# Altium PCB Urukul.PcbDoc (part 7 of 15)
Units mm, origin at the board's own origin, x right, y up, seen from the top; angles counter-clockwise.
Board outline 161.99 x 100 mm, 6 copper layers (L1, L2, L3, L4, P5, L6), stack 1.548 mm thick; 1078 components, 609 nets, 3798 pads, 2552 vias.
Unrouted connection lines stored in the file: 1.
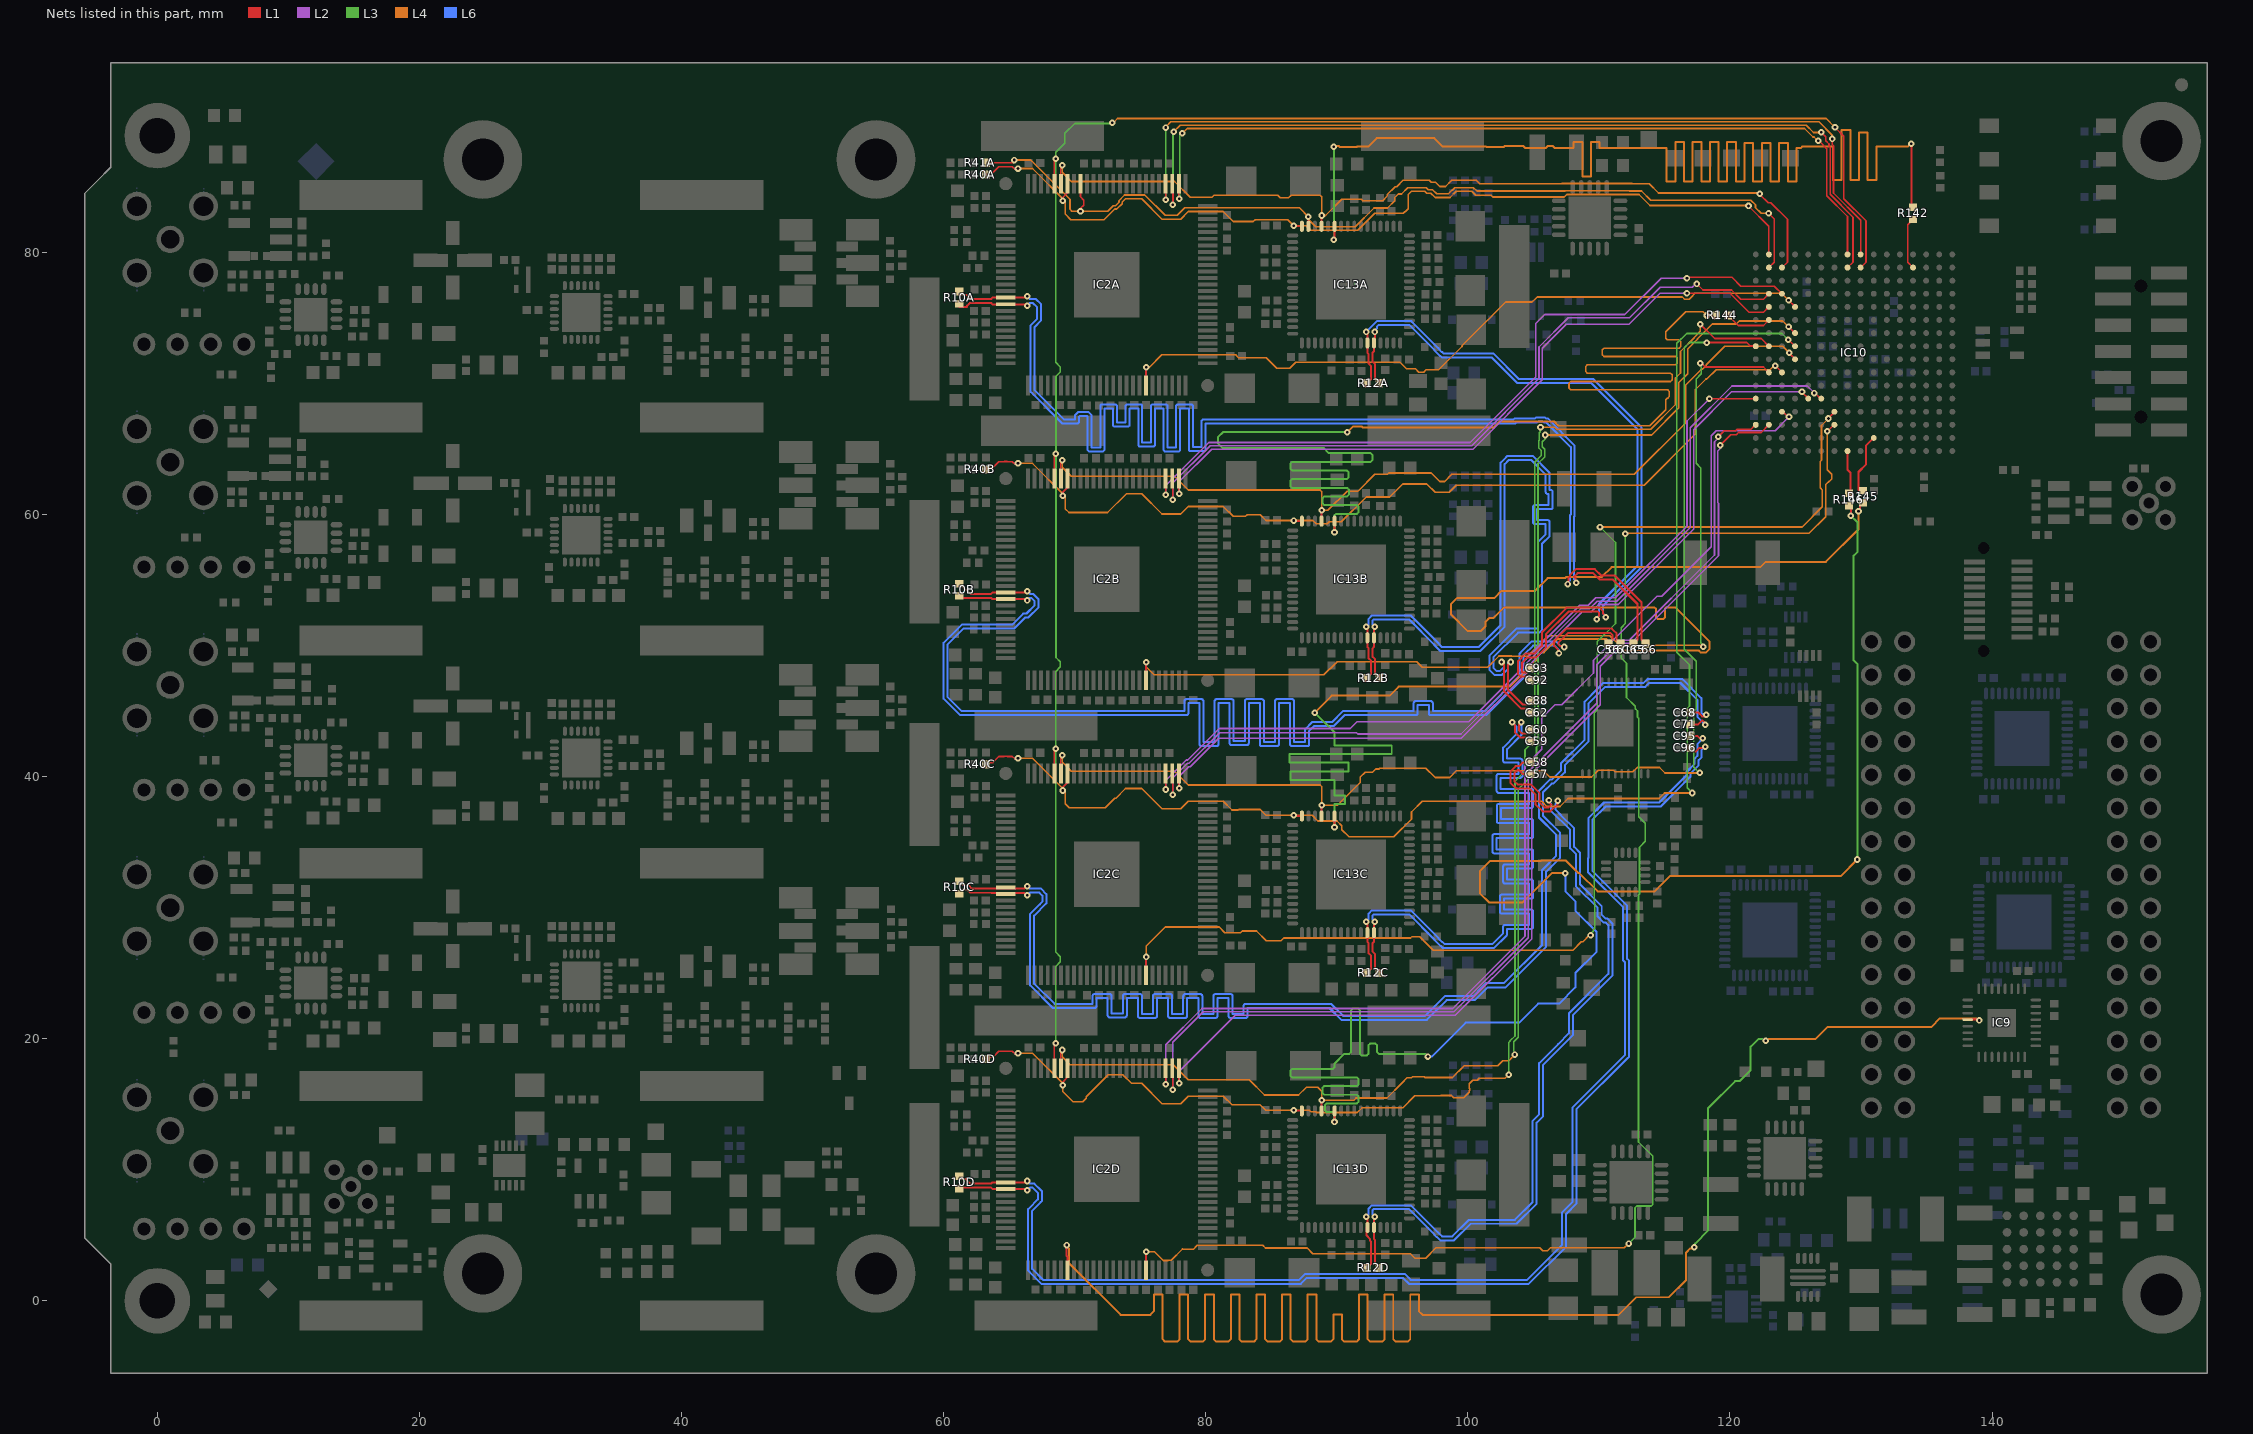
[diagram p9: the nets of this part, all layers, seen from the top]

## Via types
v1: diameter 0.5, hole 0.2, L1 to L6, tented both sides, 1964 vias
v2: diameter 0.5, hole 0.2, L1 to L6, 480 vias
v3: diameter 0.6, hole 0.3, L1 to L6, tented both sides, 52 vias
v4: diameter 0.6, hole 0.3, L1 to L6, 36 vias
v5: diameter 0.762, hole 0.508, L1 to L6, tented both sides, 20 vias

## Nets (pads, with @x,y where several pads share a name; then routed paths per layer and width w, separated by ;. In a path a pad name is that pad's centre, name@x,y a point inside that pad or via, vN(x,y) a via of type N, cw(c..) or ccw(c..) an arc to the next point about the centre after c; other vN are vias at no path point) (continued)
DDS3_SYNC_IN_P: IC2D.7 IC9.28 | length 161.9
  L1 w0.152: v1(69.381,4.256) 69.367,4.243 69.367,3.444 69.444,3.367 IC2D.7@69.444,2.341 ; IC9.28@138.141,21.455 138.958,21.455 v1(139.022,21.391)
  L3 w0.15: v1(117.276,4.075) 117.343,4.142 117.343,4.37 118.34,5.367 118.34,14.711 120.39,16.761 120.728,16.761 121.568,17.601 121.568,19.391 121.582,19.391 122.185,19.994 122.474,19.994 122.628,19.84 v1(122.723,19.84)
  L4 w0.15: v1(69.381,4.256) 69.381,4.163 69.551,3.993 69.551,2.886 73.507,-1.071 75.469,-1.071 75.77,-1.071 76.046,-0.796 76.046,0.468 76.704,0.468 76.704,-2.92 76.891,-3.107 77.814,-3.107 78.002,-2.92 78.002,0.468 78.66,0.468 78.66,-2.92 78.847,-3.107 79.77,-3.107 79.958,-2.92 79.958,0.468 80.616,0.468 80.616,-2.92 80.803,-3.107 81.726,-3.107 81.914,-2.92 81.914,0.468 82.572,0.468 82.572,-2.92 82.759,-3.107 83.682,-3.107 83.87,-2.92 83.87,0.468 84.528,0.468 84.528,-2.92 84.715,-3.107 85.638,-3.107 85.826,-2.92 85.826,0.468 86.484,0.468 86.484,-2.92 86.671,-3.107 87.594,-3.107 87.782,-2.92 87.782,0.468 88.44,0.468 88.44,-2.92 88.627,-3.107 89.55,-3.107 89.738,-2.92 89.738,-1.046 90.396,-1.046 90.396,-2.92 90.583,-3.107 91.506,-3.107 91.694,-2.92 91.694,0.468 92.352,0.468 92.352,-2.92 92.539,-3.107 93.462,-3.107 93.65,-2.92 93.65,0.468 94.308,0.468 94.308,-2.92 94.495,-3.107 95.418,-3.107 95.606,-2.92 95.606,0.468 96.264,0.468 96.264,-0.796 96.539,-1.071 97.688,-1.071 111.506,-1.071 112.847,0.27 115.333,0.27 116.645,1.581 116.645,3.672 116.981,4.008 117.209,4.008 v1(117.276,4.075) ; v1(122.723,19.84) 122.817,19.84 122.971,19.994 126.533,19.994 127.444,20.905 135.385,20.905 136.025,21.545 138.774,21.545 138.927,21.391 v1(139.022,21.391)
DDS_CLKA_N: C93.1 IC13A.28 R12A.2 | length 53.9
  L1 w0.152: v1(92.91,73.927) 92.91,73.167 IC13A.28@92.834,73.091 92.834,72.453 92.75,72.369 92.727,72.369 92.727,71.648 92.921,71.453 92.921,70.331 R12A.2@93.239,70.013 ; C93.1@104.794,48.248 104.496,47.951 104.14,47.951 104.14,48.691 104.546,49.097 105.216,49.097 105.96,49.841 105.96,50.866 107.679,52.584 109.923,52.584 110.013,52.495 110.013,52.279 109.838,52.105 v1(109.838,52.016)
  L6 w0.152: v1(92.91,73.927) 92.91,74.021 93.084,74.196 93.084,74.346 93.18,74.442 94.532,74.442 94.539,74.449 94.914,74.449 94.921,74.442 95.565,74.442 97.438,72.569 97.438,72.543 97.897,72.084 97.923,72.084 98.044,71.963 101.841,71.963 103.77,70.033 109.427,70.033 112.944,66.516 112.944,56.103 110.009,53.169 110.009,52.279 109.838,52.108 v1(109.838,52.016)
DDS_CLKA_P: C92.1 IC13A.27 R12A.1 | length 56.2
  L1 w0.152: R12A.1@92.299,70.013 92.617,70.331 92.617,71.327 92.422,71.521 92.422,72.243 92.334,72.331 IC13A.27@92.334,73.091 v1@92.334,73.851 ; C92.1@104.794,47.348 104.496,47.646 104.013,47.646 103.835,47.824 103.835,48.817 104.42,49.402 105.09,49.402 105.312,49.625 105.312,49.635 105.648,49.971 105.648,50.995 107.549,52.897 108.836,52.897 108.844,52.889 110.05,52.889 110.317,52.621 110.317,52.425 110.523,52.22 v1(110.523,52.162)
  L6 w0.152: v1(92.258,73.927) 92.258,73.951 93.054,74.747 94.405,74.747 94.412,74.754 95.04,74.754 95.047,74.747 95.691,74.747 97.743,72.695 97.743,72.669 98.023,72.389 98.049,72.389 98.171,72.268 101.967,72.268 103.897,70.338 109.553,70.338 113.249,66.643 113.249,55.977 110.657,53.385 110.657,53.375 110.322,53.04 110.322,52.425 110.523,52.224 v1(110.523,52.162)
DDS_CLKB0_N: C66.1 IC2A.91 R10A.2 | length 103.8
  L1 w0.152: R10A.2@61.194,75.818 61.78,75.818 61.801,75.839 61.801,75.932 62.007,76.138 63.62,76.138 63.718,76.041 IC2A.91@64.744,76.041 v1@66.294,76.041 ; v1(107.611,54.691) 107.677,54.758 107.677,55.139 107.788,55.25 107.788,55.376 108.246,55.834 109.693,55.834 110.181,55.346 111.198,55.346 113.249,53.294 113.249,50.433 C66.1@113.544,50.138
  L6 w0.152: v1(66.394,75.941) 66.592,76.138 66.802,76.138 67.142,75.799 67.142,74.936 66.639,74.433 66.639,69.362 69.068,66.933 70.24,66.933 70.329,67.023 70.329,67.443 70.418,67.532 70.9,67.532 70.989,67.443 70.989,64.912 71.079,64.822 72.17,64.822 72.259,64.912 72.259,68.099 72.92,68.099 72.92,66.79 73.009,66.7 74.101,66.7 74.19,66.79 74.19,68.099 74.85,68.099 74.85,65.278 74.939,65.189 76.031,65.189 76.12,65.278 76.12,68.099 76.781,68.099 76.781,64.912 76.87,64.822 77.961,64.822 78.051,64.912 78.051,68.099 78.711,68.099 78.711,64.918 78.8,64.829 79.892,64.829 79.981,64.918 79.981,66.933 103.606,66.933 103.694,67.022 105.269,67.022 105.356,67.109 105.732,67.109 105.819,67.022 105.963,67.022 107.786,65.199 107.852,65.133 107.852,60.005 107.788,59.941 107.788,54.954 107.611,54.777 v1(107.611,54.691)
DDS_CLKB0_P: C65.1 IC2A.90 R10A.1 | length 103
  L1 w0.152: R10A.1@61.194,76.758 61.78,76.758 62.095,76.443 63.62,76.443 63.718,76.541 IC2A.90@64.744,76.541 v1@66.294,76.541 ; v1(108.271,54.787) 108.204,54.854 108.204,55.139 108.093,55.25 108.373,55.53 109.566,55.53 110.055,55.041 111.072,55.041 112.945,53.168 112.945,50.439 C65.1@112.644,50.138
  L6 w0.152: v1(66.394,76.641) 66.528,76.506 66.592,76.443 67.03,76.443 67.446,76.027 67.446,74.81 66.944,74.307 66.944,69.488 69.194,67.238 70.024,67.238 70.024,67.569 70.292,67.837 71.026,67.837 71.294,67.569 71.294,65.127 71.955,65.127 71.955,68.315 72.044,68.404 73.135,68.404 73.225,68.315 73.225,67.005 73.885,67.005 73.885,68.315 73.974,68.404 75.066,68.404 75.155,68.315 75.155,65.493 75.815,65.493 75.815,68.315 75.905,68.404 76.996,68.404 77.085,68.315 77.085,65.127 77.746,65.127 77.746,68.315 77.835,68.404 78.927,68.404 79.016,68.315 79.016,65.133 79.676,65.133 79.676,67.149 79.765,67.238 103.479,67.238 103.568,67.327 105.143,67.327 105.23,67.414 105.858,67.414 105.945,67.327 106.089,67.327 108.157,65.259 108.157,59.879 108.093,59.815 108.093,55.05 108.271,54.873 v1(108.271,54.787)
DDS_CLKB1_N: C61.1 IC2B.91 R10B.2 | length 103.3
  L1 w0.152: R10B.2@61.194,53.788 61.344,53.638 63.62,53.638 63.718,53.541 IC2B.91@64.744,53.541 66.294,53.541 v1(66.394,53.441) ; v1(106.951,49.412) 106.884,49.479 106.884,49.675 106.59,49.97 106.59,50.355 107.52,51.285 110.987,51.285 111.133,51.139 111.346,50.925 111.346,50.436 C61.1@111.644,50.138
  L6 w0.152: v1(66.394,53.441) 66.592,53.638 66.694,53.638 66.944,53.388 66.944,53.064 66.324,52.444 66.095,52.444 66.005,52.355 65.243,51.593 61.383,51.593 60.075,50.284 59.986,50.195 59.986,45.955 60.075,45.865 61.257,44.683 78.52,44.683 ccw(c78.52,44.836) 78.673,44.836 78.673,45.599 79.52,45.599 79.52,42.475 ccw(c79.673,42.475) 79.673,42.322 80.825,42.322 ccw(c80.825,42.475) 80.977,42.475 80.977,45.599 81.825,45.599 81.825,42.553 ccw(c81.977,42.553) 81.977,42.4 83.13,42.4 ccw(c83.13,42.553) 83.282,42.553 83.282,45.599 84.13,45.599 84.13,42.475 ccw(c84.282,42.475) 84.282,42.322 85.435,42.322 ccw(c85.435,42.475) 85.587,42.475 85.587,45.599 86.435,45.599 86.435,42.475 ccw(c86.587,42.475) 86.587,42.322 87.739,42.322 ccw(c87.739,42.475) 87.892,42.475 87.892,43.484 88.268,43.86 89.766,43.86 90.589,44.683 96.02,44.683 ccw(c96.02,44.836) 96.173,44.836 96.173,45.453 97.02,45.453 97.02,44.836 ccw(c97.173,44.836) 97.173,44.683 101.401,44.683 104.241,47.523 104.241,49.245 104.314,49.318 104.314,49.322 104.978,49.986 106.629,49.986 106.951,49.664 v1(106.951,49.412)
DDS_CLKB1_P: C56.1 IC2B.90 R10B.1 | length 102.5
  L1 w0.152: R10B.1@61.194,54.728 61.631,54.291 61.694,54.291 62.042,53.943 63.62,53.943 63.718,54.041 IC2B.90@64.744,54.041 66.294,54.041 v1(66.394,54.141) ; v1(107.369,49.889) 107.311,49.947 107.055,49.947 106.902,50.1 106.902,50.226 107.649,50.973 110.857,50.973 110.906,50.923 110.917,50.923 111.042,50.799 111.042,50.436 C56.1@110.744,50.138
  L6 w0.152: v1(66.394,54.141) 66.592,53.943 66.82,53.943 67.249,53.515 67.249,52.938 66.45,52.139 66.221,52.139 65.37,51.288 61.51,51.288 60.29,50.069 60.29,46.081 61.383,44.988 78.368,44.988 78.368,45.752 cw(c78.52,45.752) 78.52,45.904 79.673,45.904 cw(c79.673,45.752) 79.825,45.752 79.825,42.627 80.673,42.627 80.673,45.752 cw(c80.825,45.752) 80.825,45.904 81.977,45.904 cw(c81.977,45.752) 82.13,45.752 82.13,42.705 82.977,42.705 82.977,45.752 cw(c83.13,45.752) 83.13,45.904 84.282,45.904 cw(c84.282,45.752) 84.435,45.752 84.435,42.627 85.282,42.627 85.282,45.752 cw(c85.435,45.752) 85.435,45.904 86.587,45.904 cw(c86.587,45.752) 86.739,45.752 86.739,42.627 87.587,42.627 87.587,43.61 88.142,44.165 89.64,44.165 90.463,44.988 95.858,44.988 95.868,44.998 95.868,45.605 cw(c96.02,45.605) 96.02,45.758 97.173,45.758 cw(c97.173,45.605) 97.325,45.605 97.325,44.988 101.275,44.988 103.936,47.649 103.936,49.371 104.009,49.444 104.009,49.448 104.852,50.291 106.755,50.291 107.161,49.885 107.166,49.889 v1(107.369,49.889)
DDS_CLKB2_N: C71.1 IC2C.91 R10C.2 | length 105.4
  L1 w0.152: R10C.2@61.194,31.071 61.214,31.071 61.428,31.285 61.428,31.295 61.517,31.385 61.773,31.385 62.022,31.136 63.634,31.136 63.636,31.135 63.981,31.135 64.001,31.115 64.67,31.115 IC2C.91@64.744,31.041 64.818,31.115 65.487,31.115 65.507,31.135 66.131,31.135 66.325,30.941 v1(66.394,30.941) ; v1@66.394,31.041 v1@66.42,31.041 ; C71.1@116.994,43.988 117.58,43.988 117.878,44.286 118.101,44.063 v1(118.101,43.959)
  L6 w0.152: v1(66.394,30.941) 66.592,31.138 67.31,31.138 67.539,30.91 67.539,30.455 67.335,30.251 66.605,29.521 66.605,24.077 68.341,22.341 71.52,22.341 ccw(c71.52,22.493) 71.673,22.493 71.673,23.099 72.52,23.099 72.52,21.78 ccw(c72.673,21.78) 72.673,21.627 73.825,21.627 ccw(c73.825,21.78) 73.977,21.78 73.977,23.099 74.825,23.099 74.825,21.739 ccw(c74.977,21.739) 74.977,21.587 76.13,21.587 ccw(c76.13,21.739) 76.282,21.739 76.282,23.099 77.13,23.099 77.13,21.739 ccw(c77.282,21.739) 77.282,21.587 78.435,21.587 ccw(c78.435,21.739) 78.587,21.739 78.587,23.099 79.435,23.099 79.435,21.739 ccw(c79.587,21.739) 79.587,21.587 80.739,21.587 ccw(c80.739,21.739) 80.892,21.739 80.892,23.099 81.739,23.099 81.739,21.739 ccw(c81.892,21.739) 81.892,21.587 83.044,21.587 ccw(c83.044,21.739) 83.197,21.739 83.197,22.341 89.444,22.341 90.352,21.433 96.878,21.433 98.379,22.934 100.533,22.934 101.242,23.644 ; 101.242,23.65 101.511,23.92 102.88,23.92 105.972,27.011 105.972,32.74 107.046,33.814 107.046,35.699 105.735,37.011 105.735,38.805 106.387,39.458 106.527,39.458 107.395,40.325 107.395,40.873 109.22,42.697 109.22,45.592 110.468,46.84 113.542,46.84 113.845,47.143 114.781,47.143 114.782,47.142 116.227,47.142 117.507,45.862 117.507,44.553 v1(118.101,43.959)
DDS_CLKB2_P: C68.1 IC2C.90 R10C.1 | length 105
  L1 w0.152: R10C.1@61.194,32.011 61.214,32.011 61.428,31.797 61.428,31.786 61.517,31.697 61.903,31.697 62.151,31.449 63.764,31.449 63.765,31.447 63.981,31.447 64.001,31.467 64.67,31.467 IC2C.90@64.744,31.541 64.818,31.467 65.487,31.467 65.507,31.447 66.131,31.447 66.325,31.641 v1(66.394,31.641) ; C68.1@116.994,44.888 117.58,44.888 117.878,44.591 v1@118.144,44.591
  L6 w0.152: v1(66.394,31.641) 66.592,31.443 67.436,31.443 67.843,31.036 67.843,30.328 66.91,29.394 66.91,24.204 66.92,24.204 68.471,22.653 70.865,22.653 70.871,22.648 70.871,22.646 71.368,22.646 71.368,23.252 cw(c71.52,23.252) 71.52,23.404 72.673,23.404 cw(c72.673,23.252) 72.825,23.252 72.825,21.932 73.673,21.932 73.673,23.252 cw(c73.825,23.252) 73.825,23.404 74.977,23.404 cw(c74.977,23.252) 75.13,23.252 75.13,21.892 75.977,21.892 75.977,23.252 cw(c76.13,23.252) 76.13,23.404 77.282,23.404 cw(c77.282,23.252) 77.435,23.252 77.435,21.892 78.282,21.892 78.282,23.252 cw(c78.435,23.252) 78.435,23.404 79.587,23.404 cw(c79.587,23.252) 79.739,23.252 79.739,21.892 80.587,21.892 80.587,23.252 cw(c80.739,23.252) 80.739,23.404 81.892,23.404 cw(c81.892,23.252) 82.044,23.252 82.044,21.892 82.892,21.892 82.892,22.493 cw(c83.044,22.493) 83.044,22.646 89.571,22.646 90.478,21.738 91.36,21.738 91.368,21.746 96.749,21.746 98.25,23.247 100.403,23.247 101.113,23.956 101.113,23.963 101.382,24.232 102.751,24.232 105.66,27.141 105.66,29.927 105.667,29.934 105.667,32.033 105.66,32.041 105.66,32.869 106.734,33.943 106.734,35.57 105.428,36.876 105.428,36.887 ; 105.43,36.887 105.43,38.932 106.261,39.762 106.401,39.762 107.09,40.452 107.09,40.999 108.915,42.823 108.915,45.718 109.932,46.735 110.342,47.145 113.416,47.145 113.719,47.448 114.907,47.448 114.908,47.447 116.353,47.447 116.377,47.423 116.388,47.423 117.82,45.991 117.82,45.247 117.816,45.243 117.816,45.156 117.818,45.154 117.818,44.892 117.939,44.771 118.114,44.771 v1(118.181,44.704)
DDS_CLKB3_N: C96.1 IC2D.91 R10D.2 | length 104.2
  L1 w0.152: R10D.2@61.194,8.571 61.259,8.636 62.281,8.636 ; 62.281,8.638 63.62,8.638 63.718,8.541 IC2D.91@64.744,8.541 66.294,8.541 v1@66.383,8.452 ; C96.1@116.994,42.188 117.051,42.245 117.386,41.911 117.663,42.188 v1@117.967,42.188
  L6 w0.152: v1(66.394,8.441) 66.592,8.638 66.794,8.638 67.194,8.238 67.194,7.738 66.534,7.078 66.445,6.989 66.445,2.307 66.534,2.217 67.457,1.294 87.258,1.294 87.722,1.758 95.046,1.758 95.51,1.294 104.646,1.294 107.492,4.14 107.492,6.622 108.277,7.408 108.277,14.602 112.164,18.488 112.312,18.636 112.312,22.801 112.312,25.938 112.16,26.091 112.16,30.15 109.499,32.811 109.499,36.702 110.515,37.718 114.731,37.718 116.987,39.974 116.987,40.225 117.61,40.849 117.61,41.247 117.814,41.451 117.814,41.769 117.82,41.774 117.82,42.008 118.083,42.271 v1(118.101,42.271)
DDS_CLKB3_P: C95.1 IC2D.90 R10D.1 | length 104.3
  L1 w0.152: R10D.1@61.194,9.511 61.414,9.291 61.694,9.291 62.042,8.943 63.62,8.943 63.718,9.041 IC2D.90@64.744,9.041 v1@66.294,9.041 ; C95.1@116.994,43.088 117.537,43.088 117.698,42.927 117.974,42.927 117.967,42.921 v1(117.935,42.921)
  L6 w0.152: v1(66.394,9.141) 66.592,8.943 66.92,8.943 67.41,8.454 67.499,8.364 67.499,7.612 67.41,7.523 66.749,6.863 66.749,2.433 67.583,1.599 87.132,1.599 87.595,2.063 95.172,2.063 95.636,1.599 104.52,1.599 107.188,4.266 107.188,6.749 107.973,7.534 107.973,14.728 112.007,18.762 112.007,22.675 112.007,25.812 111.855,25.965 111.855,29.394 111.853,29.394 111.847,29.4 111.847,30.021 109.187,32.681 109.187,33.769 109.194,33.777 109.194,36.828 110.389,38.023 114.604,38.023 116.682,40.101 116.682,40.352 117.306,40.975 117.306,41.373 117.51,41.577 117.51,41.769 117.507,41.771 117.507,42.477 117.935,42.905 v1(117.935,42.921)
DDS_CLKB_N: C88.1 IC13B.28 R12B.2 | length 59.3
  L1 w0.152: v1(92.91,51.427) 92.834,51.351 IC13B.28@92.834,50.591 92.834,49.89 92.736,49.792 92.736,49.138 92.921,48.953 92.921,47.831 R12B.2@93.239,47.513 ; v1(103.27,48.742) 103.073,48.544 103.073,48.297 103.064,48.289 103.064,46.634 104.207,45.491 104.496,45.491 C88.1@104.794,45.788
  L6 w0.152: v1(92.91,51.427) 92.736,51.601 92.736,51.915 92.808,51.986 95.521,51.986 97.438,50.069 97.438,50.043 97.897,49.584 100.954,49.584 102.81,51.44 102.81,63.835 103.14,64.166 104.819,64.166 105.944,63.041 105.944,61.715 ccw(c106.096,61.715) 106.096,61.562 106.173,61.562 106.173,60.715 105.133,60.715 ccw(c105.133,60.562) 104.981,60.562 104.981,59.41 ccw(c105.133,59.41) 105.133,59.257 105.944,59.257 105.944,58.496 105.355,57.907 105.355,51.38 105.266,51.291 103.703,51.291 101.639,49.227 101.639,48.165 102.068,47.736 102.57,47.736 102.66,47.825 103.073,48.239 v1@103.073,48.691
DDS_CLKB_P: C62.1 IC13B.27 R12B.1 | length 60
  L1 w0.152: v1(92.258,51.427) 92.334,51.351 IC13B.27@92.334,50.591 92.334,49.89 92.432,49.792 92.432,49.012 92.617,48.827 92.617,47.831 R12B.1@92.299,47.513 ; v1(102.57,48.742) 102.717,48.742 102.768,48.691 102.768,48.424 ; 102.759,48.38 102.759,46.507 104.081,45.186 104.496,45.186 C62.1@104.794,44.888
  L6 w0.152: v1(92.258,51.427) 92.432,51.601 92.432,52.041 92.682,52.291 95.647,52.291 97.743,50.195 97.743,50.169 98.023,49.889 100.828,49.889 102.505,51.566 102.505,63.962 102.925,64.381 103.014,64.47 104.945,64.47 106.249,63.167 106.249,61.867 106.325,61.867 cw(c106.325,61.715) 106.477,61.715 106.477,60.562 cw(c106.325,60.562) 106.325,60.41 105.286,60.41 105.286,59.562 106.096,59.562 cw(c106.096,59.41) 106.249,59.41 106.249,58.352 105.66,57.763 105.66,51.228 105.673,51.215 105.444,50.986 103.829,50.986 101.944,49.101 101.944,48.291 102.194,48.041 102.444,48.041 102.768,48.365 102.768,48.544 v1(102.57,48.742)
DDS_CLKC_N: C60.1 IC13C.28 R12C.2 | length 60.4
  L1 w0.152: v1@92.834,28.792 IC13C.28@92.834,28.091 92.834,27.39 92.736,27.292 92.736,26.638 92.921,26.453 92.921,25.331 R12C.2@93.239,25.013 ; v1(104.083,44.144) 103.886,43.947 103.886,43.519 104.114,43.291 104.496,43.291 C60.1@104.794,43.588
  L6 w0.152: v1(92.91,28.927) 92.736,29.101 92.736,29.415 92.806,29.484 95.523,29.484 97.438,27.569 97.438,27.543 97.897,27.084 97.923,27.084 98.102,26.905 101.989,26.905 102.91,27.825 102.999,27.915 102.999,28.386 104.832,28.386 ccw(c104.832,28.538) 104.985,28.538 104.985,29.691 ccw(c104.832,29.691) 104.832,29.843 102.753,29.843 102.753,30.691 104.832,30.691 ccw(c104.832,30.843) 104.985,30.843 104.985,31.995 ccw(c104.832,31.995) 104.832,32.148 102.999,32.148 102.999,32.995 104.832,32.995 ccw(c104.832,33.148) 104.985,33.148 104.985,34.3 ccw(c104.832,34.3) 104.832,34.453 102.168,34.453 102.168,35.3 104.832,35.3 ccw(c104.832,35.453) 104.985,35.453 104.985,36.605 ccw(c104.832,36.605) 104.832,36.757 102.513,36.757 102.513,37.605 104.832,37.605 ccw(c104.832,37.757) 104.985,37.757 104.985,38.91 ccw(c104.832,38.91) 104.832,39.062 102.508,39.062 102.508,39.91 104.008,39.91 ccw(c104.008,40.062) 104.16,40.062 104.16,41.215 ccw(c104.008,41.215) 104.008,41.367 102.999,41.367 102.999,42.089 104.083,43.173 v1(104.083,44.144)
DDS_CLKC_P: C59.1 IC13C.27 R12C.1 | length 61.2
  L1 w0.152: v1@92.245,28.94 v1(92.258,28.927) 92.334,28.851 IC13C.27@92.334,28.091 92.334,27.39 92.432,27.292 92.432,26.512 92.617,26.327 92.617,25.331 R12C.1@92.299,25.013 ; v1(103.383,44.144) 103.581,43.947 103.581,43.393 103.978,42.995 103.978,42.986 104.496,42.986 C59.1@104.794,42.688
  L6 w0.152: v1(92.258,28.927) 92.432,29.101 92.432,29.541 92.68,29.789 95.649,29.789 97.743,27.695 97.743,27.669 98.023,27.389 98.049,27.389 98.228,27.21 101.863,27.21 102.694,28.041 102.694,28.538 cw(c102.846,28.538) 102.846,28.691 104.68,28.691 104.68,29.538 102.6,29.538 cw(c102.6,29.691) 102.448,29.691 102.448,30.843 cw(c102.6,30.843) 102.6,30.995 104.68,30.995 104.68,31.843 102.846,31.843 cw(c102.846,31.995) 102.694,31.995 102.694,33.148 cw(c102.846,33.148) 102.846,33.3 104.68,33.3 104.68,34.148 102.015,34.148 cw(c102.015,34.3) 101.863,34.3 101.863,35.453 cw(c102.015,35.453) 102.015,35.605 104.68,35.605 104.68,36.453 102.361,36.453 cw(c102.361,36.605) 102.208,36.605 102.208,37.757 cw(c102.361,37.757) 102.361,37.91 104.68,37.91 104.68,38.757 102.355,38.757 cw(c102.355,38.91) 102.203,38.91 102.203,40.062 cw(c102.355,40.062) 102.355,40.215 103.855,40.215 103.855,41.062 102.846,41.062 cw(c102.846,41.215) 102.694,41.215 102.694,42.215 103.695,43.217 103.695,43.832 v1(103.383,44.144)
DDS_CLKD_N: C58.1 IC13D.28 R12D.2 | length 62.5
  L1 w0.152: v1@92.834,6.292 IC13D.28@92.834,5.591 92.834,4.724 92.921,4.637 92.921,2.831 R12D.2@93.239,2.513 ; C58.1@104.794,41.088 104.208,41.088 103.91,40.791 103.649,40.791 103.242,40.383 103.242,39.528 103.674,39.096 104.69,39.096 105.147,38.639 105.147,37.903 105.706,37.343 106.289,37.343 106.849,37.903 v1(106.849,38.16)
  L6 w0.152: v1(92.91,6.427) 92.736,6.601 92.736,6.915 92.808,6.986 95.521,6.986 97.438,5.069 97.438,5.043 97.617,4.864 97.652,4.864 97.907,4.609 98.943,4.609 100.213,5.879 103.713,5.879 105.249,7.415 105.249,13.596 105.749,14.096 105.749,18.009 108.013,20.273 108.013,21.031 108.017,21.035 108.017,21.793 111.034,24.81 111.034,28.791 110.665,29.16 110.51,29.16 110.217,29.452 110.217,30.118 108.56,31.775 108.56,34.188 108.102,34.645 108.102,36.059 107.102,37.059 107.103,37.06 107.103,37.069 106.675,37.497 106.675,37.897 106.849,38.071 v1(106.849,38.16)
DDS_CLKD_P: C57.1 IC13D.27 R12D.1 | length 61.1
  L1 w0.152: R12D.1@92.299,2.513 92.617,2.831 92.617,4.51 92.529,4.598 92.529,4.729 92.266,4.992 92.266,5.523 IC13D.27@92.334,5.591 v1@92.334,6.351 ; C57.1@104.794,40.188 104.208,40.188 103.91,40.486 103.775,40.486 103.547,40.257 103.547,39.655 103.801,39.401 104.816,39.401 105.452,38.765 105.452,38.029 105.833,37.648 106.163,37.648 106.37,37.855 v1@106.163,38.063
  L6 w0.152: v1(92.258,6.427) 92.432,6.601 92.432,7.041 92.682,7.291 95.647,7.291 97.743,5.195 97.743,5.169 97.779,5.169 98.034,4.914 98.817,4.914 100.087,6.184 103.587,6.184 104.944,7.541 104.944,13.722 105.444,14.222 105.444,18.136 106.886,19.578 107.708,20.4 107.708,21.161 107.704,21.164 107.704,21.922 110.722,24.94 110.722,28.662 110.536,28.847 110.38,28.847 109.905,29.323 109.905,29.988 108.247,31.646 108.247,32.791 108.255,32.799 108.255,34.061 107.797,34.519 107.797,35.933 106.362,37.368 106.362,37.918 106.188,38.092 v1(106.188,38.181)
DDS_CSN0: IC2A.70 IC10.B3 IC13A.61 | length 67.4
  L1 w0.127: IC2A.70@68.944,85.241 68.944,86.538 v1(69.044,86.638) ; IC13A.61@88.834,81.991 88.834,82.803 v1(88.844,82.813) ; v1(122.285,84.463) 122.285,84.421 122.911,83.795 123.115,83.795 124.386,82.524 124.386,79.256 IC10.B3@123.97,78.841
  L4 w0.127: v1(69.044,86.638) 69.044,86.113 69.744,85.413 77.619,85.413 78.815,84.217 80.482,84.217 80.628,84.363 85.495,84.363 85.696,84.162 86.312,84.162 86.513,84.363 88.719,84.363 88.844,84.238 v1(88.844,82.813) 89.138,82.813 90.372,84.047 91.884,84.047 91.986,83.945 93.504,83.945 93.854,84.295 93.854,84.412 94.453,85.012 94.57,85.012 95.056,85.497 97.058,85.497 97.212,85.343 97.527,85.343 97.848,85.023 98.292,85.023 98.767,85.497 100.649,85.497 100.906,85.241 107.176,85.241 107.19,85.254 112.535,85.254 112.549,85.241 113.838,85.241 114.551,84.528 122.22,84.528 v1(122.285,84.463)
DDS_CSN1: IC2B.70 IC10.J4 IC13B.61 | length 68.7
  L1 w0.127: IC2B.70@68.944,62.741 68.944,64.038 v1(69.044,64.138) ; IC13B.61@88.834,59.491 88.834,60.303 v1(88.844,60.313) ; v1@124.604,72.234 124.604,72.231 124.97,71.865 IC10.J4@124.97,71.841
  L4 w0.127: v1(69.044,64.138) 69.044,63.613 69.744,62.913 77.619,62.913 78.669,61.863 88.719,61.863 88.844,61.738 v1(88.844,60.313) 89.319,60.313 90.789,61.783 91.614,61.783 92.889,63.058 93.863,63.058 93.973,63.168 97.203,63.168 97.848,62.523 98.234,62.523 98.777,63.066 112.704,63.066 116.612,66.973 116.612,69.856 117.554,70.798 117.856,71.1 117.923,71.1 118.181,71.358 118.181,71.425 119.597,72.841 124.017,72.841 v1(124.517,72.341)
DDS_CSN2: IC2C.70 IC10.H1 IC13C.61 | length 95.2
  L1 w0.127: IC2C.70@68.944,40.241 68.944,41.538 v1(69.044,41.638) ; IC13C.61@88.834,36.991 88.834,37.803 v1(88.844,37.813) ; v1(118.223,73.118) 121.277,73.118 121.554,72.841
  L1 w0.152: 121.554,72.841 IC10.H1@121.97,72.841
  L3 w0.127: v1(117.681,40.279) 117.241,40.719 117.241,44.993 117.426,45.177 117.426,48.805 116.506,49.724 116.506,72.713 116.911,73.118 v1(118.223,73.118)
  L4 w0.127: v1(69.044,41.638) 69.044,41.113 69.744,40.413 77.619,40.413 78.669,39.363 88.719,39.363 88.844,39.238 v1(88.844,37.813) 90.055,37.813 91.796,39.554 91.796,39.971 92.164,40.338 92.719,40.338 92.965,40.584 93.217,40.584 93.271,40.639 96.799,40.639 97.511,39.927 98.626,39.927 99.133,40.435 105.779,40.435 106.251,39.963 109.431,39.963 109.962,40.494 111.117,40.494 111.252,40.359 112.589,40.359 112.926,40.696 114.621,40.696 115.038,40.279 v1(117.681,40.279)
DDS_CSN3: IC2D.70 IC10.G4 IC13D.61 | length 114.8
  L1 w0.127: IC2D.70@68.944,17.741 68.944,19.038 v1(69.044,19.138) ; IC13D.61@88.834,14.491 88.834,15.303 v1(88.844,15.313) ; v1(124.47,74.327) 124.477,74.327 124.963,73.841 IC10.G4@124.97,73.841
  L3 w0.127: v1(103.584,18.791) 103.497,18.877 103.497,19.756 103.848,20.107 103.848,39.041 105.241,40.433 105.241,42.249 105.359,42.367 105.359,63.885 105.863,64.39 105.863,64.986 105.677,65.173 105.677,65.538 105.894,65.755 v1(105.894,66.065)
  L4 w0.127: v1(69.044,19.138) 69.044,18.613 69.635,18.023 77.51,18.023 78.669,16.863 83.32,16.863 84.485,15.698 87.08,15.698 87.686,16.304 88.539,16.304 88.844,15.999 v1(88.844,15.313) 91.303,15.313 91.47,15.48 93.829,15.48 94.95,16.601 95.356,17.008 95.706,17.008 95.783,17.085 96.68,17.085 96.728,17.038 98.814,17.038 99.714,17.938 102.278,17.938 102.66,18.32 103.113,18.32 v1(103.584,18.791) ; v1(105.894,66.065) 105.899,66.071 114.026,66.071 116.104,68.148 116.104,70.066 116.785,70.748 116.785,72.633 117.528,73.376 117.528,73.406 118.655,74.532 120.468,74.532 120.703,74.767 124.03,74.767 v1(124.47,74.327)
DDS_I/O_RESET: IC2A.71 IC2B.71 IC2C.71 IC2D.71 IC10.B9 | length 149.7
  L1 w0.127: IC2D.71@68.444,17.741 68.444,19.538 v1(68.544,19.638) ; IC2C.71@68.444,40.241 68.444,42.038 v1(68.544,42.138) ; IC2B.71@68.444,62.741 68.444,64.538 v1(68.544,64.638) ; IC2A.71@68.444,85.241 68.444,87.038 v1(68.544,87.138) ; v1(128.016,89.534) 128.69,88.86 128.69,84.098 130.385,82.403 130.385,79.256 IC10.B9@129.97,78.841
  L3 w0.127: v1(68.544,19.638) 68.544,25.505 68.91,25.87 68.91,25.96 68.902,25.968 68.902,26.264 68.544,26.622 v1(68.544,42.138) 68.544,48.005 68.91,48.37 68.91,48.465 68.902,48.473 68.902,48.764 68.578,49.087 68.578,70.539 68.91,70.87 68.91,71.256 68.544,71.622 v1(68.544,87.138) 68.544,87.638 69.234,88.329 69.234,89.079 69.995,89.839 72.824,89.839 v1(72.862,89.877)
  L4 w0.127: v1(72.862,89.877) 72.936,89.877 73.268,90.21 127.34,90.21 v1(128.016,89.534)
DDS_PLL_LOCK0: IC2A.19 IC10.E4 | length 55.3
  L1 w0.127: IC2A.19@75.444,69.841 75.444,71.227 v1(75.455,71.238) ; v1(124.47,76.341) IC10.E4@124.97,75.841
  L4 w0.127: v1(75.455,71.238) 75.709,71.238 76.655,72.184 82.279,72.184 82.498,71.965 84.607,71.965 85.414,71.158 86.404,71.158 86.861,71.614 94.819,71.614 95.325,71.108 96.004,71.108 96.262,70.85 96.626,70.85 96.813,71.037 97.764,71.037 99.551,72.823 99.551,72.884 102.881,76.214 104.923,76.214 105.304,76.595 116.372,76.595 116.538,76.43 116.902,76.43 117.16,76.688 117.16,76.716 117.316,76.871 123.94,76.871 v1(124.47,76.341)
DDS_PLL_LOCK1: IC2B.19 IC10.K2 | length 74
  L1 w0.127: IC2B.19@75.444,47.341 75.444,48.727 v1(75.455,48.738) ; v1(117.741,71.541) 117.842,71.541 118.126,71.256 122.554,71.256 IC10.K2@122.97,70.841
  L3 w0.127: v1(117.741,71.541) 117.812,71.469 117.812,71.285 117.817,71.28 117.817,70.73 117.419,70.332 117.419,63.904 117.775,63.548 117.775,50.21 117.969,50.015 v1(117.969,49.914)
  L4 w0.127: v1(75.455,48.738) 75.455,48.368 76.054,47.769 89.002,47.769 89.462,48.229 89.502,48.229 90.04,48.767 96.095,48.767 96.511,48.35 101.521,48.35 102.378,49.207 103.357,49.207 103.373,49.191 104.57,49.191 106.135,50.756 110.831,50.756 111.568,50.019 117.813,50.019 117.918,49.914 v1(117.969,49.914)
DDS_PLL_LOCK2: IC2C.19 IC10.N7 | length 96
  L1 w0.127: IC2C.19@75.444,24.841 75.444,26.227 v1(75.455,26.238) ; v1@127.613,67.461 127.621,67.461 127.97,67.81 IC10.N7@127.97,67.841
  L3 w0.127: v1(109.363,27.884) 109.363,27.985 109.574,28.196 109.574,28.32 109.692,28.438 109.692,30.387 109.634,30.446 109.634,44.873 109.865,45.105 109.865,49.477 109.88,49.491 109.88,50.301 111.264,51.685 111.264,57.861 v1(110.084,59.041)
  L4 w0.127: v1(75.455,26.238) 75.455,27.068 76.911,28.524 81.026,28.524 81.458,28.092 82.652,28.092 82.779,28.219 83.871,28.219 84.621,27.469 85.742,27.469 85.958,27.685 95.631,27.685 95.732,27.787 96.321,27.787 97.35,26.758 108.019,26.758 108.651,27.39 108.78,27.39 109.275,27.884 v1(109.363,27.884) ; v1(110.084,59.041) 125.507,59.041 127.053,60.587 127.053,61.871 126.879,62.045 126.879,62.698 126.885,62.703 126.885,64.038 126.98,64.134 126.98,66.789 v1(127.515,67.324)
DDS_PLL_LOCK3: IC2D.19 IC10.P7 | length 120.6
  L1 w0.127: IC2D.19@75.444,2.341 75.444,3.713 v1(75.469,3.738) ; v1@127.522,66.341 127.522,66.417 127.945,66.841 IC10.P7@127.97,66.841
  L3 w0.127: v1(112.014,58.541) 112.014,51.682 111.7,51.368 111.7,49.055 112.103,48.652 112.103,46.037 112.784,45.356 112.784,45.165 112.946,45.003 112.946,44.546 113.05,44.441 113.05,36.941 113.541,36.45 113.541,35.063 113.093,34.615 113.093,31.044 113.025,30.976 113.025,12.121 114.121,11.025 114.121,7.365 113.995,7.239 112.878,7.239 112.751,7.112 112.751,4.851 v1(112.268,4.369)
  L4 w0.127: v1(75.469,3.738) 76.086,3.738 76.751,3.073 77.137,3.073 77.162,3.098 77.37,3.098 78.226,3.954 78.238,3.942 79.063,3.942 79.321,4.2 79.321,4.233 84.358,4.233 84.561,4.029 87.746,4.029 88.175,3.6 95.625,3.6 95.973,3.252 96.778,3.252 97.567,4.041 105.479,4.041 105.712,3.808 106.076,3.808 106.309,4.041 111.94,4.041 v1(112.268,4.369) ; v1(112.014,58.541) 112.033,58.559 126.034,58.559 127.31,59.836 127.31,62.282 127.478,62.45 127.508,62.45 127.766,62.708 127.766,63.073 127.421,63.417 v1(127.421,66.341)
DDS_Profile0.P0: IC2A.54 IC10.A9 | length 68.2
  L1 w0.127: v1(76.944,84.013) IC2A.54@76.944,85.241 ; v1(127.796,88.655) 127.817,88.633 127.817,88.205 127.898,88.124 127.898,84.531 129.97,82.459 IC10.A9@129.97,79.841
  L3 w0.127: v1(76.944,84.013) 76.953,84.022 76.953,89.517 v1(76.962,89.525)
  L4 w0.127: v1(76.962,89.525) 76.962,89.585 77.332,89.956 126.794,89.956 127.812,88.938 127.812,88.671 v1(127.796,88.655)
DDS_Profile0.P1: IC2A.53 IC10.B8 | length 68.5
  L1 w0.127: IC2A.53@77.444,85.241 77.495,85.189 v1(77.495,83.642) ; v1(126.974,89.153) 127.302,88.825 127.302,88.526 127.558,88.269 127.558,88.104 127.644,88.019 127.644,84.426 129.386,82.684 129.386,79.256 IC10.B8@128.97,78.841
  L3 w0.127: v1(77.495,83.642) 77.495,89.151 77.494,89.152 v1(77.546,89.204)
  L4 w0.127: v1(77.546,89.204) 78.044,89.702 125.829,89.702 126.378,89.153 v1(126.974,89.153)
DDS_Profile0.P2: IC2A.52 IC10.A8 | length 65.1
  L1 w0.127: IC2A.52@77.944,85.241 77.944,84.113 77.961,84.096 v1(77.975,84.096) ; v1(126.744,88.514) 126.79,88.514 127.39,87.914 127.39,84.321 128.97,82.741 IC10.A8@128.97,79.841
  L3 w0.127: v1(77.975,84.096) 78.011,84.132 78.011,89.034 78.105,89.128 78.155,89.077 v1(78.206,89.077)
  L4 w0.127: v1(78.206,89.077) 78.577,89.448 125.689,89.448 126.331,88.805 126.408,88.805 126.699,88.514 v1(126.744,88.514)
DDS_Profile1.P0: IC2B.54 IC10.D3 | length 58.4
  L1 w0.127: v1(76.944,61.513) IC2B.54@76.944,62.741 ; v1(116.72,78.031) 116.782,78.093 120.156,78.093 120.825,77.425 123.386,77.425 IC10.D3@123.97,76.841
  L2 w0.127: v1(76.944,61.513) 76.944,62.205 80.236,65.497 100.18,65.497 105.175,70.491 105.175,74.574 105.859,75.258 111.973,75.258 114.746,78.031 v1(116.72,78.031)
DDS_Profile1.P1: IC2B.53 IC10.D2 | length 56.8
  L1 w0.127: IC2B.53@77.444,62.741 77.494,62.691 v1(77.494,61.113) ; v1(117.47,77.591) 117.937,77.124 120.113,77.124 120.812,76.425 122.554,76.425 IC10.D2@122.97,76.841
  L2 w0.127: v1(77.494,61.113) 77.494,62.395 80.341,65.243 100.286,65.243 105.429,70.386 105.429,72.783 107.65,75.004 112.34,75.004 114.673,77.337 117.115,77.337 117.369,77.591 v1(117.47,77.591)
DDS_Profile1.P2: IC2B.52 IC10.E2 | length 55.2
  L1 w0.127: IC2B.52@77.944,62.741 77.944,61.613 77.961,61.596 v1(77.975,61.596) ; v1(116.72,76.87) 120.008,76.87 121.453,75.425 122.554,75.425 IC10.E2@122.97,75.841
  L2 w0.127: v1(77.975,61.596) 77.975,62.518 80.447,64.989 100.391,64.989 105.683,70.281 105.683,72.678 107.509,74.503 112.291,74.503 114.658,76.87 v1(116.72,76.87)
DDS_Profile2.P0: IC2C.54 IC10.M1 | length 64
  L1 w0.127: v1(76.944,39.013) IC2C.54@76.944,40.241 ; v1(118.437,68.838) 118.438,68.839 IC10.M1@121.97,68.841 IC10.M1@121.97,68.841
  L2 w0.127: v1(76.944,39.013) 76.944,39.705 78.501,41.262 78.617,41.262 81.03,43.674 91.025,43.674 91.54,44.189 100.059,44.189 104.219,48.349 104.219,48.765 108.53,53.077 109.198,53.077 109.761,53.639 111.257,53.639 116.726,59.109 116.726,67.127 v1(118.437,68.838)
  L3 w0.127: v1@76.937,39.02 v1(76.944,39.013)
DDS_Profile2.P1: IC2C.53 IC10.M6 | length 70
  L1 w0.127: IC2C.53@77.444,40.241 77.494,40.191 v1(77.494,38.613) ; v1(126.445,69.265) 126.495,69.265 126.92,68.841 IC10.M6@126.97,68.841
  L2 w0.127: v1(77.494,38.613) 77.494,39.895 78.606,41.008 78.723,41.008 81.062,43.347 91.502,43.347 91.596,43.253 99.482,43.253 104.473,48.244 104.473,48.66 108.636,52.823 109.303,52.823 109.866,53.385 111.362,53.385 116.98,59.004 116.98,66.622 120.162,69.803 125.907,69.803 v1(126.445,69.265)
DDS_Profile2.P2: IC2C.52 IC10.M5 | length 67.2
  L1 w0.127: IC2C.52@77.944,40.241 77.944,39.113 77.961,39.096 v1(77.975,39.096) ; v1(125.496,69.363) 125.496,69.339 125.97,68.865 IC10.M5@125.97,68.841
  L2 w0.127: v1(77.975,39.096) 77.975,40.018 78.712,40.754 78.828,40.754 80.992,42.918 99.507,42.918 104.727,48.138 104.727,48.555 108.741,52.569 109.409,52.569 109.971,53.131 111.467,53.131 117.234,58.898 117.234,66.474 120.122,69.363 v1(125.496,69.363)
DDS_Profile3.P0: IC2D.54 IC10.N3 | length 86.9
  L1 w0.127: v1(76.944,16.513) IC2D.54@76.944,17.741 ; IC10.N3@123.97,67.841 124.041,67.841 124.433,67.449 v1(124.503,67.449)
  L2 w0.127: v1(76.944,16.513) 76.944,19.532 79.71,22.298 98.836,22.298 104.356,27.818 104.356,40.791 105.64,42.075 105.64,44.469 106.652,45.482 107.166,45.482 109.584,47.9 109.584,48.872 110.662,49.95 110.662,49.994 114.435,53.767 114.794,53.767 118.567,57.54 118.567,66.011 118.956,66.4 123.455,66.4 v1(124.503,67.449)
DDS_Profile3.P1: IC2D.53 IC10.P1 | length 83.5
  L1 w0.127: IC2D.53@77.444,17.741 77.494,17.691 v1(77.494,16.113) ; v1(119.117,65.939) 119.573,66.395 120.433,66.395 120.549,66.51 121.61,66.51 121.94,66.841 IC10.P1@121.97,66.841
  L2 w0.127: v1(77.494,16.113) 77.494,19.722 79.815,22.044 98.941,22.044 104.61,27.713 104.61,40.367 106.516,42.273 106.526,42.273 109.838,45.585 109.838,48.525 111.723,50.409 112.323,50.409 118.821,56.907 118.821,65.541 119.117,65.838 v1(119.117,65.939)
DDS_Profile3.P2: IC2D.52 IC10.P2 | length 81.6
  L1 w0.127: IC2D.52@77.944,17.741 77.944,16.613 77.961,16.596 v1(77.975,16.596) ; v1(119.27,65.29) 120.055,66.076 120.474,66.076 120.654,66.256 122.386,66.256 IC10.P2@122.97,66.841
  L2 w0.127: v1(77.975,16.596) 77.975,17.518 82.248,21.79 99.046,21.79 104.864,27.608 104.864,40.262 106.621,42.019 106.632,42.019 110.092,45.479 110.092,48.419 111.828,50.155 112.428,50.155 119.125,56.852 119.125,60.858 119.075,60.908 119.075,64.842 119.344,65.111 119.341,65.114 119.341,65.219 v1(119.27,65.29)
DDS_RESET0: IC13A.59 R142.1 | length 130.6
  L1 w0.152: v1(89.771,80.97) 89.834,81.033 IC13A.59@89.834,81.991 ; v1(133.846,88.276) 133.846,83.578 R142.1@133.97,83.454
  L3 w0.152: v1(89.763,88.061) 89.771,88.053 v1(89.771,80.97)
  L4 w0.152: v1(89.763,88.061) 89.819,88.116 90.16,88.116 90.235,88.042 91.515,88.042 91.545,88.071 92.398,88.071 93.043,88.717 97.452,88.717 98.098,88.071 101.4,88.071 101.43,88.042 102.736,88.042 102.81,88.116 104.242,88.116 104.394,87.964 105.944,87.964 106.096,88.116 106.492,88.116 106.644,87.964 107.744,87.964 108.074,87.964 108.074,88.404 108.734,88.404 108.734,87.964 108.734,85.8 109.394,85.8 109.394,87.964 109.394,88.404 110.054,88.404 110.054,87.964 110.399,87.964 115.116,87.964 115.173,87.964 115.173,85.424 115.833,85.424 115.833,87.964 115.833,88.404 116.493,88.404 116.493,87.964 116.493,85.424 117.153,85.424 117.153,87.964 117.153,88.404 117.813,88.404 117.813,87.964 117.813,85.424 118.473,85.424 118.473,87.964 118.473,88.404 119.133,88.404 119.133,87.964 119.133,85.424 119.793,85.424 119.793,87.964 119.793,88.404 120.453,88.404 120.453,87.964 120.453,85.424 121.113,85.424 121.113,87.964 121.113,88.353 121.773,88.353 121.773,87.964 121.773,85.424 122.433,85.424 122.433,87.964 122.433,88.353 123.093,88.353 123.093,87.964 123.093,85.424 123.753,85.424 123.753,87.964 123.753,88.353 124.413,88.353 124.413,87.964 124.413,85.424 125.073,85.424 125.073,87.964 125.403,87.964 125.5,88.061 127.562,88.061 127.869,88.061 127.869,85.521 128.529,85.521 128.529,88.061 128.529,89.334 129.189,89.334 129.189,88.061 129.189,85.521 129.849,85.521 129.849,88.061 129.849,89.151 130.509,89.151 130.509,88.061 130.509,85.521 131.169,85.521 131.169,88.061 131.499,88.061 133.583,88.061 133.798,88.276 v1(133.846,88.276)
DDS_RESET0R: IC10.B13 R142.2 | length 4
  L1 w0.127: IC10.B13@133.97,78.841 133.554,79.256 133.554,82.118 133.95,82.514 R142.2@133.97,82.514
DDS_RESET1: IC13B.59 R144.1 | length 132.1
  L1 w0.152: v1(89.826,58.646) 89.834,58.654 IC13B.59@89.834,59.491 ; v1(118.245,75.183) R144.1@118.943,75.183
  L3 w0.152: v1(89.826,58.646) 89.826,59.435 89.826,59.922 89.958,60.054 91.533,60.054 91.665,60.186 91.665,60.582 91.533,60.714 89.826,60.714 89.054,60.714 88.922,60.846 88.922,61.242 89.054,61.374 89.826,61.374 90.796,61.374 90.928,61.506 90.928,61.902 90.796,62.034 89.826,62.034 86.589,62.034 86.457,62.166 86.457,62.562 86.589,62.694 89.826,62.694 90.767,62.694 90.899,62.826 90.899,63.222 90.767,63.354 89.826,63.354 86.589,63.354 86.457,63.486 86.457,63.882 86.589,64.014 89.826,64.014 92.575,64.014 92.708,64.146 92.708,64.542 92.575,64.674 89.958,64.674 ; 90.609,64.674 89.958,64.674 ; v1(90.808,66.289) 81.462,66.289 81.457,66.294 81.331,66.294 80.92,65.882 80.92,65.42 81.264,65.075 88.994,65.075 89.395,64.674 89.958,64.674
  L4 w0.127: 106.91,66.771 113.873,66.771 115.09,67.988 115.09,68.646 115.09,68.753 115.217,68.88 115.247,68.88 115.374,69.007 115.374,69.388 115.247,69.515 115.09,69.515 107.851,69.515 107.724,69.642 107.724,70.023 107.851,70.15 115.09,70.15 115.469,70.15 115.596,70.277 115.596,70.658 115.469,70.785 115.09,70.785 109.121,70.785 108.994,70.912 108.994,71.293 109.121,71.42 115.09,71.42 115.847,71.42 115.974,71.547 115.974,71.928 115.847,72.055 115.09,72.055 110.391,72.055 110.264,72.182 110.264,72.563 110.391,72.69 115.09,72.69 116.124,72.69 116.251,72.817 116.251,73.198 116.124,73.325 115.217,73.325 115.09,73.452 115.09,73.642 115.09,73.936 116.632,75.479 117.95,75.479 v1(118.245,75.183)
  L4 w0.152: v1(90.808,66.289) 91.221,66.702 91.91,66.702 91.968,66.644 101.977,66.644 102.442,67.109 106.572,67.109 106.91,66.771
DDS_RESET1R: IC10.F2 R144.2 | length 3.6
  L1 w0.127: R144.2@119.883,75.183 119.883,75.163 120.621,74.425 122.554,74.425 IC10.F2@122.97,74.841
DDS_RESET2: IC13C.59 R145.1 | length 130.1
  L1 w0.152: v1(89.826,36.146) 89.834,36.154 IC13C.59@89.834,36.991 ; v1(129.81,60.256) 129.81,60.35 129.932,60.471 129.932,60.67 130.146,60.884 R145.1@130.166,60.884
  L3 w0.152: v1(88.319,44.876) 89.826,43.369 89.826,42.711 89.826,42.381 94.193,42.381 94.193,41.721 89.826,41.721 86.397,41.721 86.397,41.061 89.826,41.061 90.91,41.061 90.91,40.401 89.826,40.401 86.457,40.401 86.457,39.741 89.826,39.741 89.826,39.341 89.826,38.891 89.826,38.561 90.618,38.561 90.618,37.901 89.826,37.901 89.826,37.341 v1(89.826,36.146)
  L4 w0.152: v1(88.319,44.876) 89.614,46.172 94.034,46.172 94.72,46.858 103.178,46.858 105.363,49.043 105.363,49.209 105.628,49.474 105.794,49.474 106.81,50.49 110.569,50.49 111.433,49.626 117.608,49.626 117.646,49.588 117.655,49.588 117.782,49.461 118.157,49.461 118.422,49.727 118.422,50.321 115.822,52.921 115.356,52.921 115.158,52.921 115.026,52.789 115.026,52.138 114.894,52.006 114.498,52.006 114.366,52.138 114.366,52.789 114.234,52.921 113.249,52.921 102.782,52.921 101.951,52.09 101.615,52.09 101.35,51.825 101.35,51.489 100.966,51.105 100.001,51.105 98.701,52.405 98.701,53.144 99.198,53.641 102.044,53.641 102.565,54.162 105.099,54.162 106.081,55.144 107.423,55.144 107.519,55.24 110.222,55.24 110.97,55.988 122.321,55.988 122.723,56.391 127.315,56.391 129.81,58.886 v1(129.81,60.256)
DDS_RESET2R: IC10.R10 R145.2 | length 4.4
  L1 w0.152: 129.81,61.879 129.81,63.24 130.398,63.827 130.398,65.269 IC10.R10@130.97,65.841
DDS_RESET3: IC13D.59 R146.1 | length 129.3
  L1 w0.152: v1(89.826,13.646) 89.834,13.654 IC13D.59@89.834,14.491 ; R146.1@129.082,60.673 129.22,60.535 v1(129.22,59.915)
  L3 w0.152: v1@89.826,13.555 v1(89.826,13.646) 89.826,14.072 89.826,14.27 89.694,14.402 89.234,14.402 89.102,14.534 89.102,14.93 89.234,15.062 89.826,15.062 91.533,15.062 91.665,15.194 91.665,15.59 91.533,15.722 89.826,15.722 89.038,15.722 88.906,15.854 88.906,16.25 89.038,16.382 89.826,16.382 91.533,16.382 91.665,16.514 91.665,16.91 91.533,17.042 89.826,17.042 86.589,17.042 86.457,17.174 86.457,17.57 86.589,17.702 89.694,17.702 89.826,17.834 89.826,17.915 89.826,18.088 90.58,18.841 90.764,18.841 90.962,18.841 91.094,18.973 91.094,22.159 91.226,22.291 91.622,22.291 91.754,22.159 91.754,18.841 91.868,18.727 92.3,18.727 92.414,18.841 92.414,19.496 92.546,19.628 92.942,19.628 93.074,19.496 93.074,18.973 93.206,18.841 93.734,18.841 93.92,18.841 96.752,18.841 v1(96.955,18.638) ; v1(129.22,59.915) 129.746,59.389 129.746,57.163 129.442,56.859 129.442,48.865 129.598,48.709 129.746,48.561 129.746,33.7 v1(129.721,33.675)
  L4 w0.152: v1(107.445,32.634) 106.408,32.634 104.182,30.407 101.615,30.407 100.917,31.105 100.917,32.775 101.683,33.541 105.56,33.541 105.614,33.595 107.483,33.595 108.445,32.634 108.512,32.634 109.909,31.237 114.252,31.237 115.446,32.43 128.476,32.43 v1(129.721,33.675)
  L6 w0.152: v1(96.955,18.638) 97.247,18.638 99.837,21.229 103.915,21.229 105.362,22.677 106.963,22.677 108.207,23.921 108.207,25.014 109.82,26.627 109.82,27.395 109.816,27.399 109.816,28.161 108.207,29.769 108.207,30.475 107.445,31.237 v1(107.445,32.634)
DDS_RESET3R: IC10.T8 R146.2 | length 3.4
  L1 w0.152: IC10.T8@128.97,64.841 128.97,63.408 129.198,63.18 129.198,61.729 R146.2@129.082,61.613
DDS_SCKI0: IC2A.69 IC10.A2 IC13A.64 R40A.2 | length 72.6
  L1 w0.127: R40A.2@63.234,85.938 63.234,85.739 63.571,86.076 63.769,86.076 63.787,86.094 63.787,86.109 64.212,86.534 64.611,86.534 64.621,86.544 64.867,86.544 64.877,86.534 65.247,86.534 65.443,86.338 65.501,86.396 v1(65.675,86.396) ; v1(69.094,83.938) 69.094,84.186 69.444,84.536 IC2A.69@69.444,85.241 ; v1(86.719,82.038) 86.766,81.991 IC13A.64@87.334,81.991 ; v1(121.413,83.541) 122.97,81.984 IC10.A2@122.97,79.841
  L4 w0.127: v1(65.675,86.396) 66.786,86.396 69.286,83.896 69.286,82.921 69.708,82.499 72.241,82.499 73.046,83.304 73.219,83.304 73.631,83.716 73.631,83.846 73.874,84.088 75.119,84.088 76.668,82.539 78.095,82.539 78.669,83.113 81.342,83.113 82.101,82.354 83.631,82.354 83.766,82.489 86.269,82.489 v1(86.719,82.038) 87.658,82.038 88.011,81.685 91.596,81.685 92.898,82.987 95.075,82.987 95.196,83.108 95.214,83.108 95.444,83.339 95.444,84.41 95.694,84.66 96.711,84.66 96.865,84.506 97.181,84.506 97.501,84.186 98.639,84.186 99.114,84.66 100.303,84.66 100.607,84.356 101.767,84.356 101.898,84.225 107.345,84.225 107.537,84.417 113.06,84.417 113.899,83.579 121.375,83.579 v1(121.413,83.541)
DDS_SCKI1: IC2B.69 IC10.K3 IC13B.64 R40B.2 | length 75.5
  L1 w0.127: R40B.2@63.234,63.438 63.234,63.239 63.571,63.576 63.769,63.576 63.787,63.594 63.787,63.609 64.212,64.034 64.611,64.034 64.621,64.044 64.867,64.044 64.877,64.034 65.247,64.034 65.443,63.838 65.501,63.896 v1(65.675,63.896) ; v1(69.094,61.438) 69.094,61.686 69.444,62.036 IC2B.69@69.444,62.741 ; v1(86.719,59.538) 86.766,59.491 IC13B.64@87.334,59.491 ; v1(123.47,71.359) 123.47,71.35 123.97,70.85 IC10.K3@123.97,70.841
  L4 w0.127: v1(65.675,63.896) 66.786,63.896 69.169,61.513 69.286,61.396 69.286,60.421 69.561,60.146 72.508,60.146 73.95,61.588 75.119,61.588 76.668,60.039 78.095,60.039 78.669,60.613 81.342,60.613 82.101,59.854 83.03,59.854 83.164,59.989 84.152,59.989 84.602,59.538 v1(86.719,59.538) 88.172,59.538 88.42,59.29 89.268,59.29 89.413,59.435 90.343,59.435 92.248,61.34 94.038,61.34 95.029,62.331 96.856,62.331 97.501,61.686 98.58,61.686 99.124,62.229 107.306,62.229 108.994,62.229 113.449,62.229 117.374,66.154 117.374,69.54 118.172,70.338 118.239,70.338 118.943,71.043 123.06,71.043 123.376,71.359 v1(123.47,71.359)
DDS_SCKI2: IC2C.69 IC10.H4 IC13C.64 R40C.2 | length 108.3
  L1 w0.127: R40C.2@63.234,40.938 63.234,40.739 63.571,41.076 63.769,41.076 63.787,41.094 63.787,41.109 64.212,41.534 64.611,41.534 64.621,41.544 64.867,41.544 64.877,41.534 65.247,41.534 65.443,41.338 65.501,41.396 v1(65.675,41.396) ; v1(69.094,38.938) 69.094,39.186 69.444,39.536 IC2C.69@69.444,40.241 ; v1(86.719,37.038) 86.766,36.991 IC13C.64@87.334,36.991 ; v1(124.453,73.335) 124.464,73.335 124.958,72.841 IC10.H4@124.97,72.841
  L3 w0.127: v1(117.123,38.748) 116.733,39.138 116.733,45.203 116.918,45.388 116.918,48.524 115.948,49.493 115.948,73.054 116.707,73.812 123.975,73.812 v1(124.453,73.335)
  L4 w0.127: v1(65.675,41.396) 66.786,41.396 69.286,38.896 69.286,37.921 69.581,37.626 72.331,37.626 73.062,38.357 73.149,38.357 73.88,39.088 75.119,39.088 76.668,37.539 78.095,37.539 78.669,38.113 81.342,38.113 82.007,37.448 82.476,37.448 82.517,37.489 84.152,37.489 84.602,37.038 v1(86.719,37.038) 88.132,37.038 88.558,36.612 90.019,36.612 90.379,36.252 90.379,35.945 90.926,35.398 94.343,35.398 95.698,36.753 95.698,37.292 96.519,38.113 105.634,38.113 106.027,37.72 107.031,37.72 107.639,38.328 114.584,38.328 115.004,38.748 v1(117.123,38.748)
DDS_SCKI3: IC2D.69 IC10.H2 IC13D.64 R40D.2 | length 123.1
  L1 w0.127: R40D.2@63.234,18.438 63.234,18.239 63.571,18.576 63.769,18.576 63.787,18.594 63.787,18.609 64.212,19.034 64.611,19.034 64.621,19.044 64.867,19.044 64.877,19.034 65.247,19.034 v1@65.443,18.838 ; v1(69.094,16.438) 69.094,16.686 69.444,17.036 IC2D.69@69.444,17.741 ; v1(86.719,14.538) 86.766,14.491 IC13D.64@87.334,14.491 ; v1(117.744,74.516) 118.835,73.425 122.386,73.425 IC10.H2@122.97,72.841
  L3 w0.127: v1(103.113,17.259) 103.113,19.71 103.243,19.84 103.243,19.861 103.594,20.212 103.594,39.656 104.36,40.421 104.36,42.041 105.105,42.786 105.105,63.99 105.609,64.495 105.609,64.881 105.423,65.068 105.423,65.643 105.453,65.674 105.453,66.248 105.518,66.313 105.518,66.63 v1(105.544,66.656)
  L4 w0.127: v1(65.675,18.896) 66.786,18.896 v1@69.169,16.513 ; v1(69.094,16.438) 69.094,15.971 69.867,15.198 70.626,15.198 70.885,15.456 70.885,15.581 72.564,17.261 73.664,17.261 74.337,16.588 75.119,16.588 76.668,15.039 78.095,15.039 78.669,15.613 81.342,15.613 82.007,14.948 83.761,14.948 83.777,14.964 84.141,14.964 84.567,14.538 v1(86.719,14.538) 87.902,14.538 88.027,14.413 88.403,14.413 88.451,14.365 91.57,14.365 91.924,14.718 95.031,14.718 95.948,15.635 97.916,15.635 97.949,15.668 98.742,15.668 98.926,15.484 99.688,15.484 100.118,15.914 100.118,16.045 100.147,16.074 100.147,16.179 100.118,16.208 100.118,16.573 100.376,16.831 100.72,16.831 100.868,16.98 102.834,16.98 v1(103.113,17.259) ; v1(105.544,66.656) 106.648,66.656 106.799,66.505 113.966,66.505 115.85,68.389 115.85,70.418 116.228,70.796 116.228,72.434 117.274,73.481 117.274,73.511 117.744,73.981 v1(117.744,74.516)
DDS_SDI0: IC2A.67 IC10.B2 IC13A.63 R41A.2 | length 74.4
  L1 w0.127: R41A.2@63.234,86.838 64.485,86.838 64.495,86.848 64.993,86.848 65.003,86.838 65.244,86.838 65.375,86.969 v1(65.375,87.046) ; v1(70.444,83.138) 70.444,83.357 70.691,83.603 70.691,83.989 70.444,84.236 IC2A.67@70.444,85.241 ; IC13A.63@87.834,81.991 v1(87.834,82.723) ; v1(122.944,82.984) 123.386,82.542 123.386,79.256 IC10.B2@122.97,78.841
  L3 w0.127: v1@65.311,86.871 v1@65.344,86.838
  L4 w0.127: v1(65.375,87.046) 66.644,87.046 69.637,84.054 69.637,83.287 69.786,83.138 v1(70.444,83.138) 72.522,83.138 72.941,83.558 73.114,83.558 73.377,83.821 73.377,83.951 73.806,84.38 75.352,84.38 76.902,82.831 77.818,82.831 78.392,83.405 87.152,83.405 v1(87.834,82.723) 87.834,82.522 88.392,81.965 91.411,81.965 92.834,83.387 93.866,83.387 94.412,83.933 94.412,84.181 94.685,84.454 94.933,84.454 95.418,84.939 96.827,84.939 96.981,84.785 97.296,84.785 97.617,84.465 98.523,84.465 98.998,84.939 100.418,84.939 100.675,84.683 107.407,84.683 107.421,84.696 112.304,84.696 112.317,84.683 113.251,84.683 113.953,83.981 121.596,83.981 121.951,83.626 121.951,83.411 122.378,82.984 v1(122.944,82.984)